# Altium PCB 1-LightingAndSolenoidValve.PcbDoc (part 1 of 3)
Units mm, origin at the board's own origin, x right, y up, seen from the top; angles counter-clockwise.
Board outline 272 x 85 mm, 2 copper layers (Top Layer, Bottom Layer); 366 components, 221 nets, 1073 pads, 653 vias.
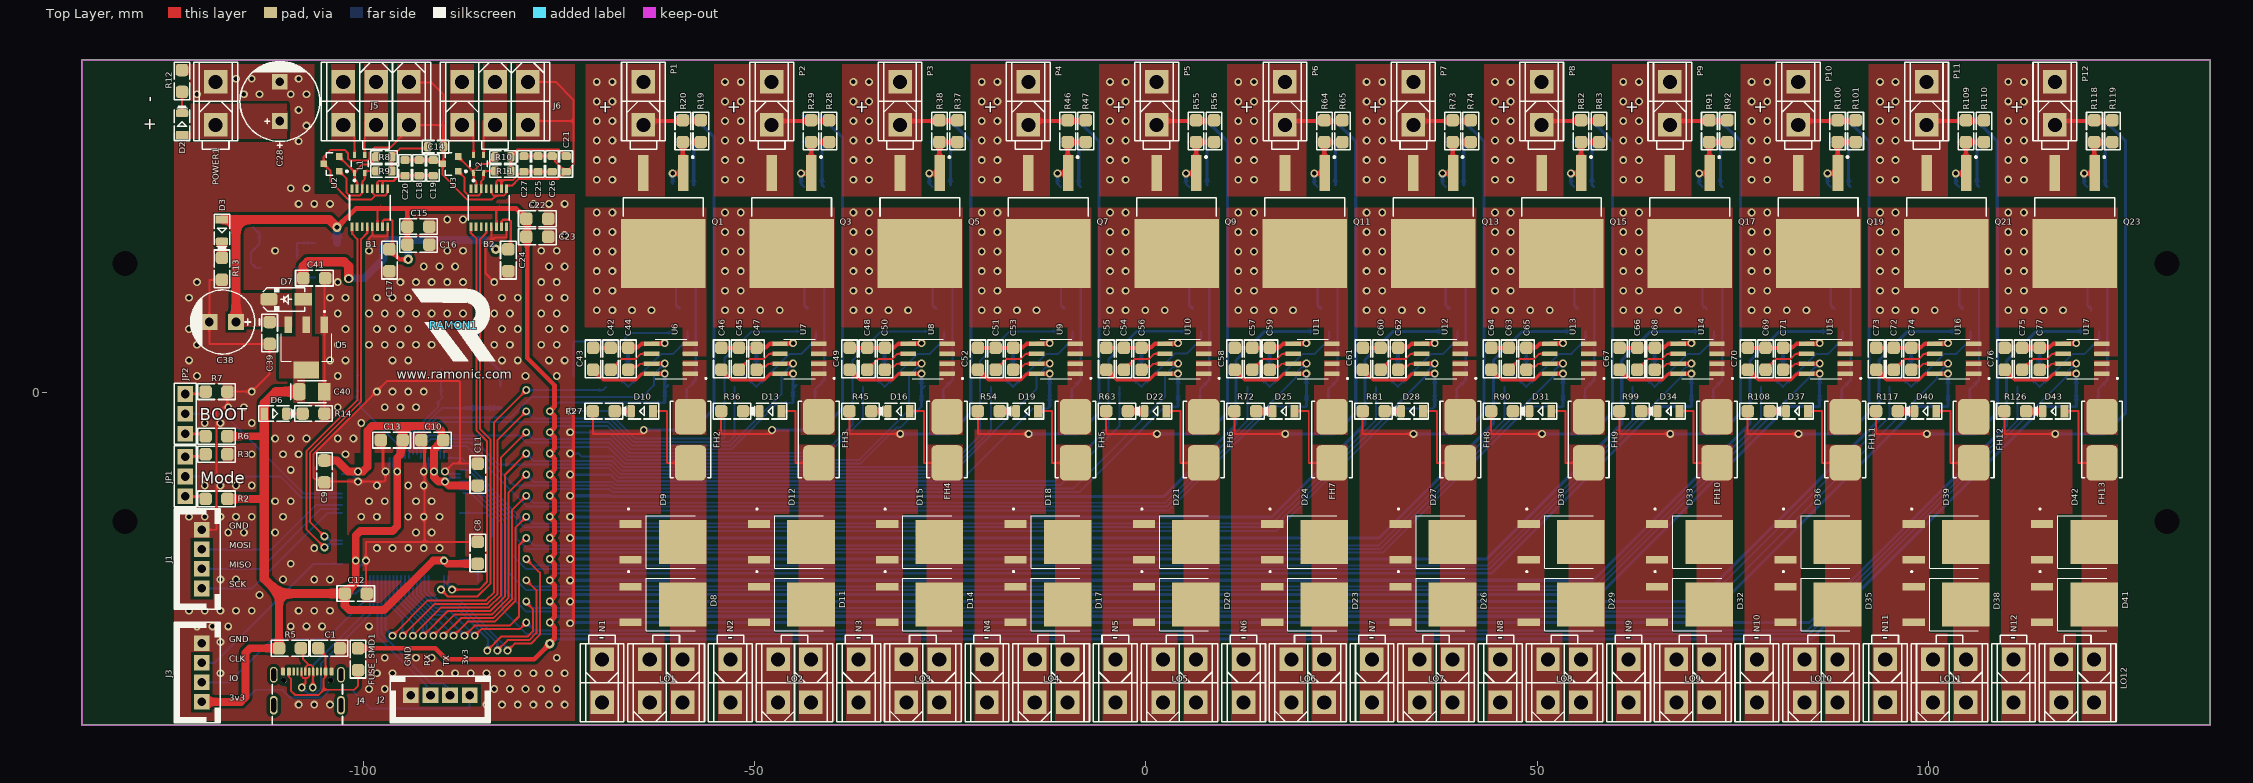
[diagram p0: Top Layer view]
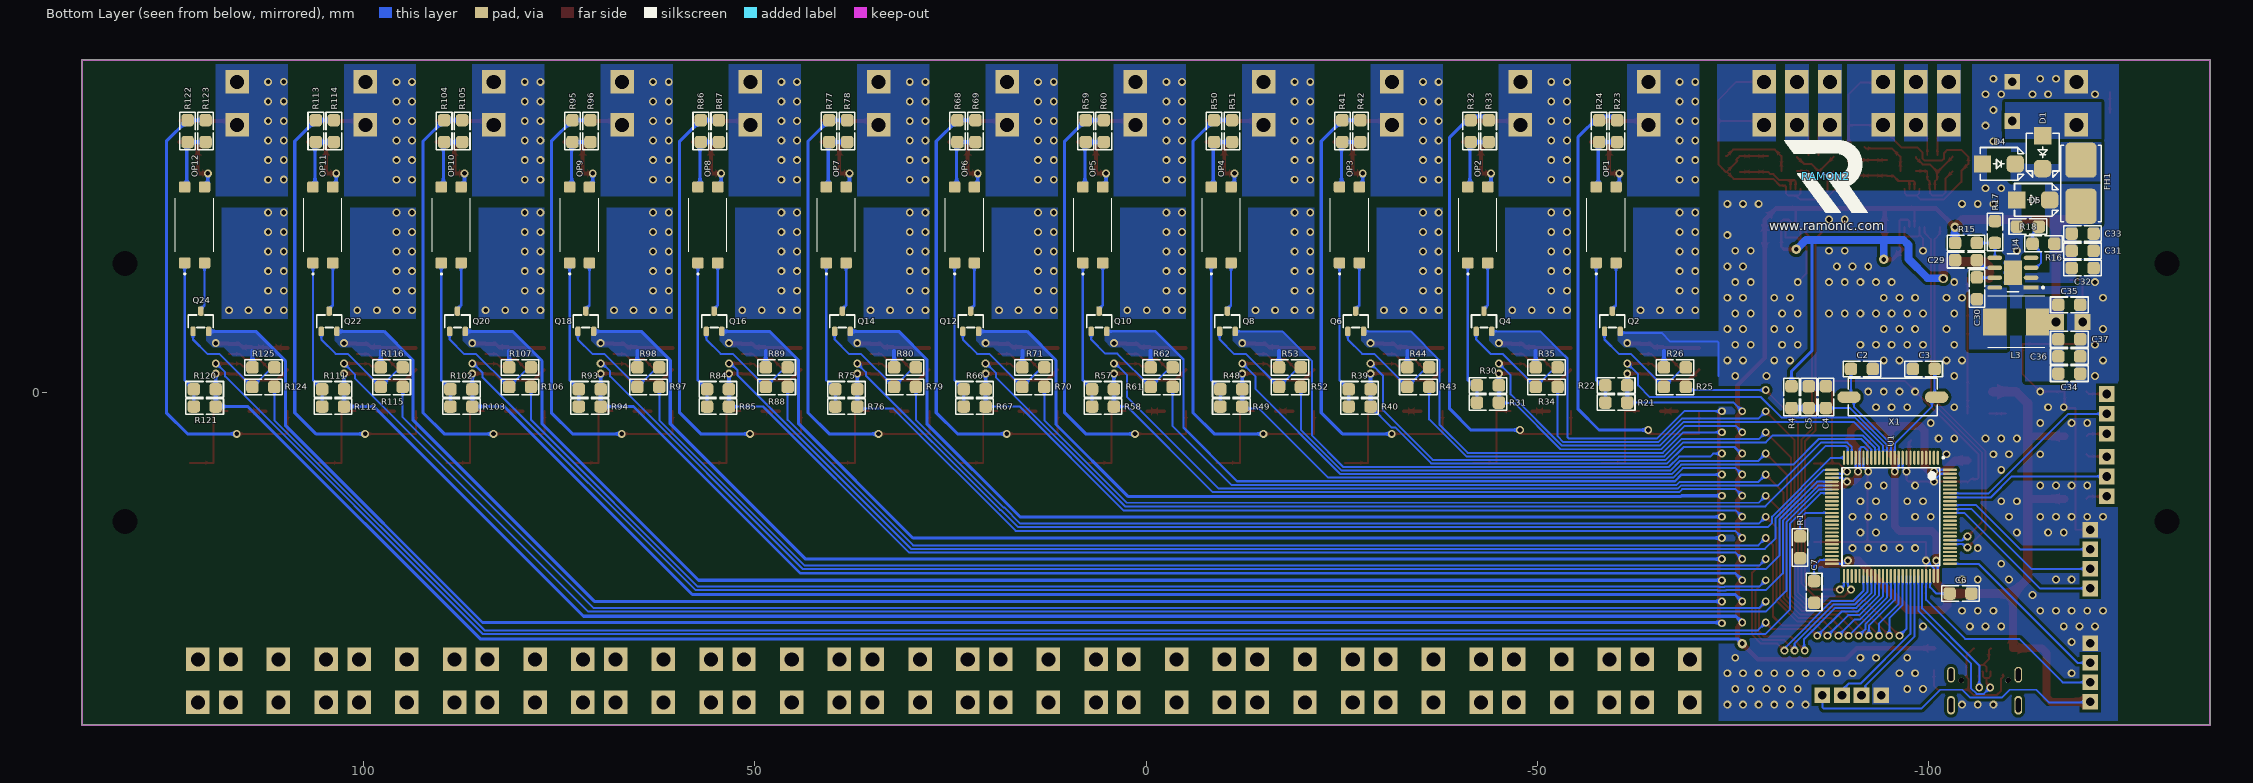
[diagram p1: Bottom Layer view, seen from below]
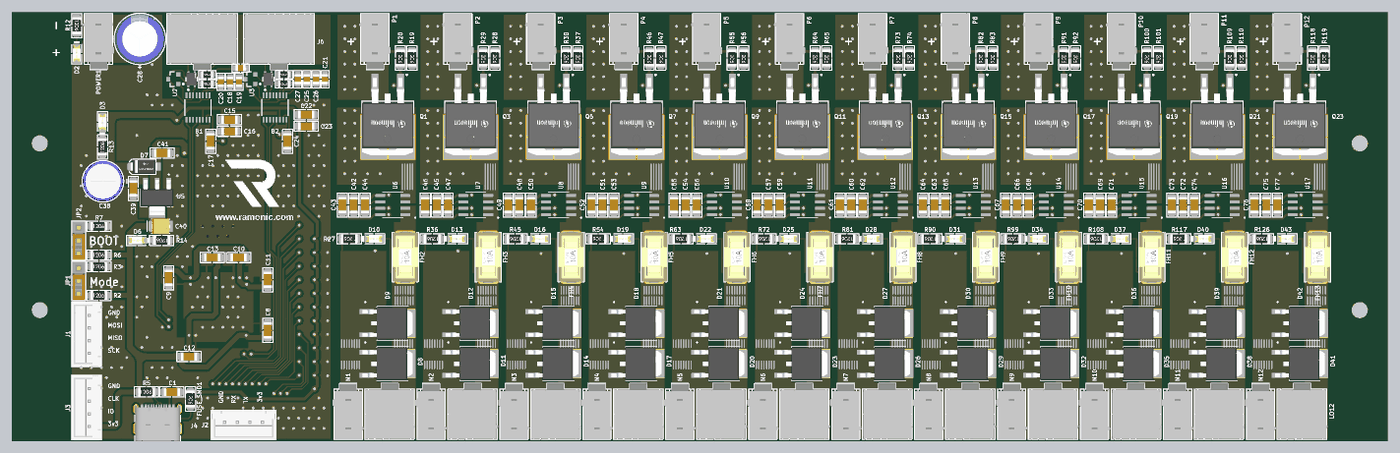
[diagram p4: 3D render of the assembled board from above, using the file's embedded part models]
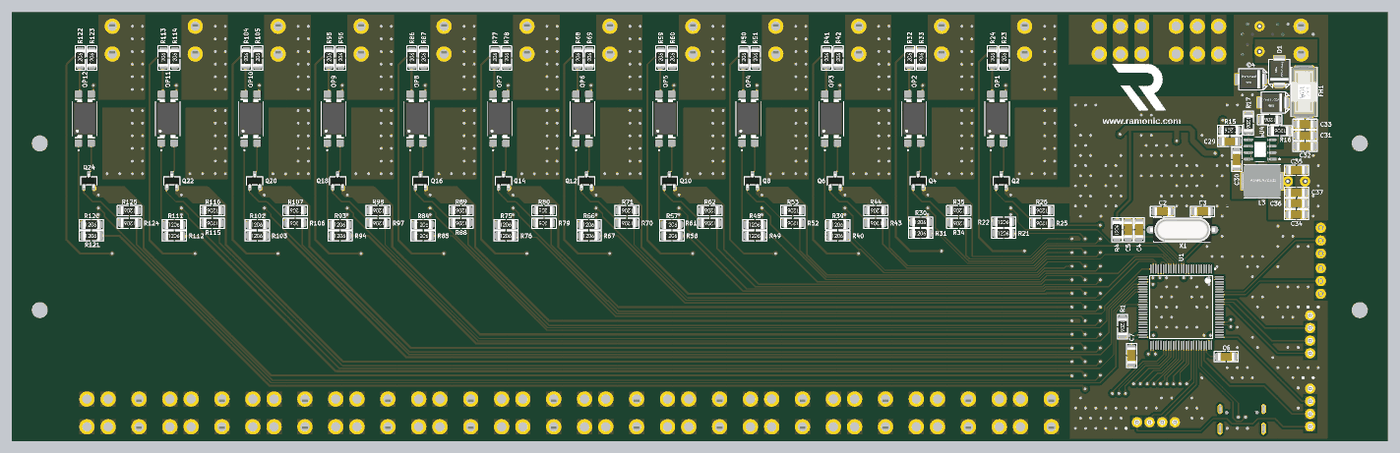
[diagram p5: 3D render of the assembled board from below, using the file's embedded part models]

## Layer stack, top to bottom
Top Solder: solder mask 0.0102, Solder Resist, Dk 3.5
Top Layer: signal copper 0.0356
Dielectric 1: dielectric 0.32, FR-4, Dk 4.8
Bottom Layer: signal copper 0.0356
Bottom Solder: solder mask 0.0102, Solder Resist, Dk 3.5

## Board outline
-136,-42.5 -136,42.5 136,42.5 136,-42.5

## Design rules (kind name [scope] priority, off if disabled: settings)
AcuteAngle [All] p1: minimum=7.50000000000000E+0001 checktracksonly=FALSE
BoardOutlineClearance [All] p1: gap=0.4 ignorepadtopadclearanceinfootprint=FALSE
Clearance "Stitching GND" [IsStitchingVia and InNet('GND') vs (IsVia and (Not IsStitchingVia)) Or IsPad] p1: gap=0.3 ignorepadtopadclearanceinfootprint=FALSE
Clearance [All] p2: gap=0.2 ignorepadtopadclearanceinfootprint=FALSE except(0.3: Arc-THPad Arc-Hole Track-THPad Track-Hole SMDPad-THPad SMDPad-Hole THPad-THPad THPad-Via THPad-Fill THPad-Region THPad-Hole Via-Via Via-Fill Via-Region Via-Hole Fill-Hole Region-Hole; 0.4: Arc-Poly Track-Poly SMDPad-Poly THPad-Poly Via-Poly Fill-Poly Poly-Poly Poly-Region Poly-Text Poly-Hole)
FanoutControl Fanout_Default [All] p1: bgadir=Out bgaviamode=Centered fanoutstyle=Auto fanoutdirection=Alternating viagrid=0.025 // Fanout_Default (Default Rule)
FanoutControl Fanout_Small [(CompPinCount < 5)] p2: bgadir=Out bgaviamode=Centered fanoutstyle=Auto fanoutdirection=OutThenIn viagrid=0.025 // Fanout_Small (Default Rule)
FanoutControl Fanout_LCC [IsLCC] p4: bgadir=Out bgaviamode=Centered fanoutstyle=Auto fanoutdirection=Alternating viagrid=0.025 // Fanout_LCC (Default Rule)
FanoutControl Fanout_BGA [IsBGA] p5: bgadir=Out bgaviamode=Centered fanoutstyle=Auto fanoutdirection=Alternating viagrid=0.025 // Fanout_BGA (Default Rule)
HoleSize [All] p1: absolutevalues=TRUE maxlimit=50 minlimit=0.4 maxpercent=80.000 minpercent=20.000
HoleToHoleClearance [All] p1: gap=0.3 allowstackedmicrovias=TRUE
MinimumAnnularRing [All] p1: minimumring=0.2
MinimumSolderMaskSliver [All] p1: minsoldermaskwidth=0.2
PlaneConnect [All] p1: planeconnectstyle=Direct reliefexpansion=0.508 reliefentries=4 reliefconductorwidth=0.254 reliefairgap=0.254
PolygonConnect [All] p1: connectstyle=Direct reliefconductorwidth=0.254 reliefentries=4 polygonreliefangle="90 Angle" airgapwidth=0.254
RoutingVias [All] p1: holewidth=0.5 width=0.9 viastyle="Through Hole" minholewidth=0.4 minwidth=0.8 maxholewidth=2 maxwidth=3
SilkToSolderMaskClearance [IsPad] p1: minsilkscreentomaskgap=0.2 clearancetoexposedcopper=TRUE
SolderMaskExpansion [All] p1: expansion=0.102 istentingtop=FALSE
SupplyNets "Schematic Supply Nets_13" [InNet('1GND')] p1: voltage=0.000
SupplyNets "Schematic Supply Nets_12" [InNet('6GND')] p2: voltage=0.000
SupplyNets "Schematic Supply Nets_11" [InNet('5GND')] p3: voltage=0.000
SupplyNets "Schematic Supply Nets_10" [InNet('MCUGND')] p4: voltage=0.000
SupplyNets "Schematic Supply Nets_9" [InNet('MGND')] p5: voltage=0.000
SupplyNets "Schematic Supply Nets_8" [InNet('4GND')] p6: voltage=0.000
SupplyNets "Schematic Supply Nets_7" [InNet('2GND')] p7: voltage=0.000
SupplyNets "Schematic Supply Nets_6" [InNet('12GND')] p8: voltage=0.000
SupplyNets "Schematic Supply Nets_5" [InNet('7GND')] p9: voltage=0.000
SupplyNets "Schematic Supply Nets_4" [InNet('8GND')] p10: voltage=0.000
SupplyNets "Schematic Supply Nets_3" [InNet('9GND')] p11: voltage=0.000
SupplyNets "Schematic Supply Nets_2" [InNet('3GND')] p12: voltage=0.000
SupplyNets "Schematic Supply Nets_1" [InNet('11GND')] p13: voltage=0.000
SupplyNets "Schematic Supply Nets" [InNet('10GND')] p14: voltage=0.000
Width [All] p1: maxlimit=10 minlimit=0.2 preferedwidth=0.254
21 further rules are at their usual default settings.

## Classes and differential pairs
component class power: C28 C29 C30 C31 C32 C33 C34 C35 C36 C37 C38 C39 C40 C41 D1 D2 D3 D4 D5 D6 D7 FH1 L3 MainInputVoltage1 POWER1 R12 R13 R14 R15 R16 R17 R18 U4 U5
component class Load12: C75 C76 C77 D41 D42 D43 FH13 LO12 N12 OP12 P12 Q23 Q24 R118 R119 R120 R121 R122 R123 R124 R125 R126 U17
component class Load11: C72 C73 C74 D38 D39 D40 FH12 LO11 N11 OP11 P11 Q21 Q22 R109 R110 R111 R112 R113 R114 R115 R116 R117 U16
component class Load10: C69 C70 C71 D35 D36 D37 FH11 LO10 N10 OP10 P10 Q19 Q20 R100 R101 R102 R103 R104 R105 R106 R107 R108 U15
component class Load9: C66 C67 C68 D32 D33 D34 FH10 LO9 N9 OP9 P9 Q17 Q18 R91 R92 R93 R94 R95 R96 R97 R98 R99 U14
component class Load8: C63 C64 C65 D29 D30 D31 FH9 LO8 N8 OP8 P8 Q15 Q16 R82 R83 R84 R85 R86 R87 R88 R89 R90 U13
component class Load7: C60 C61 C62 D26 D27 D28 FH8 LO7 N7 OP7 P7 Q13 Q14 R73 R74 R75 R76 R77 R78 R79 R80 R81 U12
component class Load6: C57 C58 C59 D23 D24 D25 FH7 LO6 N6 OP6 P6 Q11 Q12 R64 R65 R66 R67 R68 R69 R70 R71 R72 U11
component class Load5: C54 C55 C56 D20 D21 D22 FH6 LO5 N5 OP5 P5 Q9 Q10 R55 R56 R57 R58 R59 R60 R61 R62 R63 U10
component class Load4: C51 C52 C53 D17 D18 D19 FH5 LO4 N4 OP4 P4 Q7 Q8 R46 R47 R48 R49 R50 R51 R52 R53 R54 U9
component class Load3: C48 C49 C50 D14 D15 D16 FH4 LO3 N3 OP3 P3 Q5 Q6 R37 R38 R39 R40 R41 R42 R43 R44 R45 U8
component class Load2: C45 C46 C47 D11 D12 D13 FH3 LO2 N2 OP2 P2 Q3 Q4 R28 R29 R30 R31 R32 R33 R34 R35 R36 U7
component class MCU: C1 C2 C3 C4 C5 C6 C7 C8 C9 C10 C11 C12 C13 FUSE_SMD1 J1 J2 J3 J4 JP1 JP2 R1 R2 R3 R4 R5 R6 R7 RAMON1 RAMON2 U1 X1
component class CAN: B1 B2 C14 C15 C16 C17 C18 C19 C20 C21 C22 C23 C24 C25 C26 C27 J5 J6 L1 L2 R8 R9 R10 R11 U2 U3
component class Load1: C42 C43 C44 D8 D9 D10 FH2 LO1 N1 OP1 P1 Q1 Q2 R19 R20 R21 R22 R23 R24 R25 R26 R27 U6

## Components (designator, comment, footprint, x,y, rotation, side; value= is the part's Value field where it differs from the comment)
B1 "CA-IS2062A" CAIS2062A -99.2,23.6 r90 top locked
B2 "CA-IS2062A" CAIS2062A -84,23.6 r90 top locked
C1 "CAP1206 100nf 50V" C1206#1 -104.4,-32.7 r180 top
C2 "CAP1206 22pf 50V" C1206#2 -91.5,3 r0 bottom locked
C3 "CAP1206 22pf 50V" C1206#2 -99.4,3 r180 bottom locked
C4 "CAP1206 1uf 50V" C1206#2 -86.9,-0.6 r270 bottom locked
C5 "CAP1206 100nf 50V" C1206#2 -84.7,-0.6 r270 bottom locked
C6 "CAP1206 2.2uf 50V" C1206#2 -104.1,-25.7 r0 bottom
C7 "CAP1206 2.2uf 50V" C1206#2 -85.4,-25.5 r90 bottom
C8 "CAP1206 100nf 50V" C1206#1 -85.4,-20.5 r270 top locked
C9 "CAP1206 100nf 50V" C1206#1 -105,-10.1 r90 top locked
C10 "CAP1206 100nf 50V" C1206#1 -91.2,-6.1 r0 top locked
C11 "CAP1206 100nf 50V" C1206#1 -85.4,-10.5 r270 top locked
C12 "CAP1206 100nf 50V" C1206#1 -101,-25.7 r180 top locked
C13 "CAP1206 100nf 50V" C1206#1 -96.4,-6.1 r0 top locked
C14 "CAP0805 4.7nf 50V" C0805 -90.8,31.4 r0 top
C15 "CAP1206 10uf 50V" C1206#1 -93,21.2 r180 top
C16 "CAP1206 100nf 50V" C1206#1 -93,18.9 r180 top
C17 "CAP1206 100nf 50V" C1206#1 -96.7,16.9 r270 top
C18 "CAP0805 100nf 50V" C0805 -92.9,28.7 r270 top
C19 "CAP0805 100nf 50V" C0805 -91.1,28.7 r270 top
C20 "CAP0805 100nf 50V" C0805 -94.7,28.7 r270 top
C21 "CAP0805 4.7nf 50V" C0805 -74.1,29.2 r270 top
C22 "CAP1206 10uf 50V" C1206#1 -77.8,22.2 r180 top
C23 "CAP1206 100nf 50V" C1206#1 -77.8,19.9 r180 top
C24 "CAP1206 100nf 50V" C1206#1 -81.5,16.9 r270 top
C25 "CAP0805 100nf 50V" C0805 -77.7,29.2 r270 top
C26 "CAP0805 100nf 50V" C0805 -75.9,29.2 r270 top
C27 "CAP0805 100nf 50V" C0805 -79.5,29.2 r270 top
C28 "HT1V477M1012PC" C_EL_10X16 -110.7,37.191 r90 top locked value=470uF
C29 "CAP1206 1uf 50V" C1206#2 -104.8,16.9 r0 bottom
C30 "CAP1206 100nf 50V" C1206#2 -106.2,13.3 r270 bottom
C31 "CAP1206 10uf 50V" C1206#2 -119.7,18.1 r180 bottom
C32 "CAP1206 10uf 50V" C1206#2 -119.7,15.9 r180 bottom
C33 "CAP1206 220nf 50V" C1206#2 -119.7,20.3 r180 bottom
C34 "CAP1206 10uf 50V" C1206#2 -118,2.4 r180 bottom
C35 "CAP1206 10uf 50V" C1206#2 -118,11.2 r180 bottom
C36 "CAP1206 10uf 50V" C1206#2 -118,4.6 r180 bottom
C37 "CAP1206 10uf 50V" C1206#2 -118,6.8 r180 bottom
C38 "100uF" C_EL_8X12 -118,9 r180 top
C39 "CAP1206 1uf 50V" C1206#1 -112,7.6 r270 top
C40 "47uF" C_TN_3528 -106.6,0.1 r0 top
C41 "CAP1206 2.2uf 50V" C1206#1 -106.3,14.6 r0 top
C42 "CAP1206 1nf 50V" C1206#1 -68.423,4.3 r90 top
C43 "CAP1206 100nf 50V" C1206#1 -70.673,4.3 r90 top
C44 "CAP1206 1nf 50V" C1206#1 -66.173,4.3 r90 top
C45 "CAP1206 1nf 50V" C1206#1 -52.023,4.3 r90 top
C46 "CAP1206 100nf 50V" C1206#1 -54.273,4.3 r90 top
C47 "CAP1206 1nf 50V" C1206#1 -49.773,4.3 r90 top
C48 "CAP1206 1nf 50V" C1206#1 -35.623,4.3 r90 top
C49 "CAP1206 100nf 50V" C1206#1 -37.873,4.3 r90 top
C50 "CAP1206 1nf 50V" C1206#1 -33.373,4.3 r90 top
C51 "CAP1206 1nf 50V" C1206#1 -19.223,4.3 r90 top
C52 "CAP1206 100nf 50V" C1206#1 -21.473,4.3 r90 top
C53 "CAP1206 1nf 50V" C1206#1 -16.973,4.3 r90 top
C54 "CAP1206 1nf 50V" C1206#1 -2.823,4.3 r90 top
C55 "CAP1206 100nf 50V" C1206#1 -5.073,4.3 r90 top
C56 "CAP1206 1nf 50V" C1206#1 -0.573,4.3 r90 top
C57 "CAP1206 1nf 50V" C1206#1 13.577,4.3 r90 top
C58 "CAP1206 100nf 50V" C1206#1 11.327,4.3 r90 top
C59 "CAP1206 1nf 50V" C1206#1 15.827,4.3 r90 top
C60 "CAP1206 1nf 50V" C1206#1 29.977,4.3 r90 top
C61 "CAP1206 100nf 50V" C1206#1 27.727,4.3 r90 top
C62 "CAP1206 1nf 50V" C1206#1 32.227,4.3 r90 top
C63 "CAP1206 1nf 50V" C1206#1 46.377,4.3 r90 top
C64 "CAP1206 100nf 50V" C1206#1 44.127,4.3 r90 top
C65 "CAP1206 1nf 50V" C1206#1 48.627,4.3 r90 top
C66 "CAP1206 1nf 50V" C1206#1 62.777,4.3 r90 top
C67 "CAP1206 100nf 50V" C1206#1 60.527,4.3 r90 top
C68 "CAP1206 1nf 50V" C1206#1 65.027,4.3 r90 top
C69 "CAP1206 1nf 50V" C1206#1 79.177,4.3 r90 top
C70 "CAP1206 100nf 50V" C1206#1 76.927,4.3 r90 top
C71 "CAP1206 1nf 50V" C1206#1 81.427,4.3 r90 top
C72 "CAP1206 1nf 50V" C1206#1 95.577,4.3 r90 top
C73 "CAP1206 100nf 50V" C1206#1 93.327,4.3 r90 top
C74 "CAP1206 1nf 50V" C1206#1 97.827,4.3 r90 top
C75 "CAP1206 1nf 50V" C1206#1 111.977,4.3 r90 top
C76 "CAP1206 100nf 50V" C1206#1 109.727,4.3 r90 top
C77 "CAP1206 1nf 50V" C1206#1 114.227,4.3 r90 top
D1 "SS34" D_SMB -114.6,30.7 r270 bottom locked
D2 "LED1206GRN" LED1206GRN -123.2,34.3 r90 top locked
D3 "LED1206GRN" LED1206GRN -118.1,20.7 r270 top
D4 "SS34" D_SMB -109,29.2 r180 bottom
D5 "SMBJ24CA" D_SMB -113.4,24.6 r180 bottom
D6 "LED1206GRN" LED1206GRN -111.3,-2.7 r0 top
D7 "ss14" D_SMA -109.9,11.9 r180 top
D8 "SDT20B100D1" DPAK229P990X238-3N -61.733,-27.109 r270 top locked
D9 "SDT20B100D1" DPAK229P990X238-3N -61.733,-19.109 r270 top locked
D10 "LED1206GRN" LED1206GRN -64.4,-2.4 r180 top locked
D11 "SDT20B100D1" DPAK229P990X238-3N -45.333,-27.109 r270 top locked
D12 "SDT20B100D1" DPAK229P990X238-3N -45.333,-19.109 r270 top locked
D13 "LED1206GRN" LED1206GRN -48,-2.4 r180 top locked
D14 "SDT20B100D1" DPAK229P990X238-3N -28.933,-27.109 r270 top locked
D15 "SDT20B100D1" DPAK229P990X238-3N -28.933,-19.109 r270 top locked
D16 "LED1206GRN" LED1206GRN -31.6,-2.4 r180 top locked
D17 "SDT20B100D1" DPAK229P990X238-3N -12.533,-27.109 r270 top locked
D18 "SDT20B100D1" DPAK229P990X238-3N -12.533,-19.109 r270 top locked
D19 "LED1206GRN" LED1206GRN -15.2,-2.4 r180 top locked
D20 "SDT20B100D1" DPAK229P990X238-3N 3.867,-27.109 r270 top locked
D21 "SDT20B100D1" DPAK229P990X238-3N 3.867,-19.109 r270 top locked
D22 "LED1206GRN" LED1206GRN 1.2,-2.4 r180 top locked
D23 "SDT20B100D1" DPAK229P990X238-3N 20.267,-27.109 r270 top locked
D24 "SDT20B100D1" DPAK229P990X238-3N 20.267,-19.109 r270 top locked
D25 "LED1206GRN" LED1206GRN 17.6,-2.4 r180 top locked
D26 "SDT20B100D1" DPAK229P990X238-3N 36.667,-27.109 r270 top locked
D27 "SDT20B100D1" DPAK229P990X238-3N 36.667,-19.109 r270 top locked
D28 "LED1206GRN" LED1206GRN 34,-2.4 r180 top locked
D29 "SDT20B100D1" DPAK229P990X238-3N 53.067,-27.109 r270 top locked
D30 "SDT20B100D1" DPAK229P990X238-3N 53.067,-19.109 r270 top locked
D31 "LED1206GRN" LED1206GRN 50.4,-2.4 r180 top locked
D32 "SDT20B100D1" DPAK229P990X238-3N 69.467,-27.109 r270 top locked
D33 "SDT20B100D1" DPAK229P990X238-3N 69.467,-19.109 r270 top locked
D34 "LED1206GRN" LED1206GRN 66.8,-2.4 r180 top locked
D35 "SDT20B100D1" DPAK229P990X238-3N 85.867,-27.109 r270 top locked
D36 "SDT20B100D1" DPAK229P990X238-3N 85.867,-19.109 r270 top locked
D37 "LED1206GRN" LED1206GRN 83.2,-2.4 r180 top locked
D38 "SDT20B100D1" DPAK229P990X238-3N 102.267,-27.109 r270 top locked
D39 "SDT20B100D1" DPAK229P990X238-3N 102.267,-19.109 r270 top locked
D40 "LED1206GRN" LED1206GRN 99.6,-2.4 r180 top locked
D41 "SDT20B100D1" DPAK229P990X238-3N 118.667,-27.109 r270 top locked
D42 "SDT20B100D1" DPAK229P990X238-3N 118.667,-19.109 r270 top locked
D43 "LED1206GRN" LED1206GRN 116,-2.4 r180 top locked
FH1 "xf-155" FH_24101812#1 -119.5,26.7 r270 bottom value="Fuse Holder"
FH2 "FUSE HOLDER" FH_24101812#2 -58.223,-6 r90 top locked value="Fuse Holder"
FH3 "Fuse Holder" FH_24101812#2 -41.823,-6 r90 top locked
FH4 "Fuse Holder" FH_24101812#2 -25.423,-6 r90 top locked
FH5 "Fuse Holder" FH_24101812#2 -9.023,-6 r90 top locked
FH6 "Fuse Holder" FH_24101812#2 7.377,-6 r90 top locked
FH7 "Fuse Holder" FH_24101812#2 23.777,-6 r90 top locked
FH8 "Fuse Holder" FH_24101812#2 40.177,-6 r90 top locked
FH9 "Fuse Holder" FH_24101812#2 56.577,-6 r90 top locked
FH10 "Fuse Holder" FH_24101812#2 72.977,-6 r90 top locked
FH11 "Fuse Holder" FH_24101812#2 89.377,-6 r90 top locked
FH12 "Fuse Holder" FH_24101812#2 105.777,-6 r90 top locked
FH13 "Fuse Holder" FH_24101812#2 122.177,-6 r90 top locked
FUSE_SMD1 "FUSE1206" R1206#1 -100.7,-34.1 r270 top
J1 "XH_4" XH_4 -120.7,-21.3 r90 top locked
J2 "XH_4" XH_4 -90.2,-38.7 r180 top
J3 "XH_4" XH_4 -120.7,-35.8 r90 top locked
J4 "DX07S016JA1" USBC_SMD_16_DX07S016JA1 -107.19,-35.68 r180 top
J5 "CONN_ATXPWR_6" ATXPWR_6 -98.4,37.191 r0 top
J6 "CONN_ATXPWR_6" ATXPWR_6 -83.2,37.191 r0 top locked
JP1 "JMPHDR3PIN" JPH_3 -122.8,-10.74 r90 top locked
JP2 "JMPHDR3PIN" JPH_3 -122.8,-2.74 r90 top locked
L1 "ACM2520-102-2P-T002" FP-ACM2520-2P-MFG -100.5,29.2 r90 top
L2 "ACM2520-102-2P-T002" FP-ACM2520-2P-MFG -85.3,29.2 r90 top
L3 "8uH-7.3mmx6.6mm" IND_AMPLA7050S-100MT -111.2,9 r180 bottom
LO1 "CONN_ATXPWR_4" ATXPWR_4 -61.323,-37.109 r180 top
LO2 "CONN_ATXPWR_4" ATXPWR_4 -44.923,-37.109 r180 top
LO3 "CONN_ATXPWR_4" ATXPWR_4 -28.523,-37.109 r180 top
LO4 "CONN_ATXPWR_4" ATXPWR_4 -12.123,-37.109 r180 top
LO5 "CONN_ATXPWR_4" ATXPWR_4 4.277,-37.109 r180 top
LO6 "CONN_ATXPWR_4" ATXPWR_4 20.677,-37.109 r180 top
LO7 "CONN_ATXPWR_4" ATXPWR_4 37.077,-37.109 r180 top
LO8 "CONN_ATXPWR_4" ATXPWR_4 53.477,-37.109 r180 top
LO9 "CONN_ATXPWR_4" ATXPWR_4 69.877,-37.109 r180 top
LO10 "CONN_ATXPWR_4" ATXPWR_4 86.277,-37.109 r180 top
LO11 "CONN_ATXPWR_4" ATXPWR_4 102.677,-37.109 r180 top
LO12 "CONN_ATXPWR_4" ATXPWR_4 119.077,-37.109 r180 top locked
N1 "CONN_ATXPWR_2" ATXPWR_2 -69.523,-37.109 r180 top locked
N2 "CONN_ATXPWR_2" ATXPWR_2 -53.123,-37.109 r180 top locked
N3 "CONN_ATXPWR_2" ATXPWR_2 -36.723,-37.109 r180 top locked
N4 "CONN_ATXPWR_2" ATXPWR_2 -20.323,-37.109 r180 top locked
N5 "CONN_ATXPWR_2" ATXPWR_2 -3.923,-37.109 r180 top locked
N6 "CONN_ATXPWR_2" ATXPWR_2 12.477,-37.109 r180 top locked
N7 "CONN_ATXPWR_2" ATXPWR_2 28.877,-37.109 r180 top locked
N8 "CONN_ATXPWR_2" ATXPWR_2 45.277,-37.109 r180 top locked
N9 "CONN_ATXPWR_2" ATXPWR_2 61.677,-37.109 r180 top locked
N10 "CONN_ATXPWR_2" ATXPWR_2 78.077,-37.109 r180 top locked
N11 "CONN_ATXPWR_2" ATXPWR_2 94.477,-37.109 r180 top locked
N12 "CONN_ATXPWR_2" ATXPWR_2 110.877,-37.109 r180 top locked
OP1 "EL817S" SOIC254P1030X460-4N -58.8,21.4 r90 bottom
OP2 "EL817S" SOIC254P1030X460-4N -42.4,21.4 r90 bottom
OP3 "EL817S" SOIC254P1030X460-4N -26,21.4 r90 bottom
OP4 "EL817S" SOIC254P1030X460-4N -9.6,21.4 r90 bottom
OP5 "EL817S" SOIC254P1030X460-4N 6.8,21.4 r90 bottom
OP6 "EL817S" SOIC254P1030X460-4N 23.2,21.4 r90 bottom
OP7 "EL817S" SOIC254P1030X460-4N 39.6,21.4 r90 bottom
OP8 "EL817S" SOIC254P1030X460-4N 56,21.4 r90 bottom
OP9 "EL817S" SOIC254P1030X460-4N 72.4,21.4 r90 bottom
OP10 "EL817S" SOIC254P1030X460-4N 88.8,21.4 r90 bottom
OP11 "EL817S" SOIC254P1030X460-4N 105.2,21.4 r90 bottom
OP12 "EL817S" SOIC254P1030X460-4N 121.6,21.4 r90 bottom
P1 "CONN_ATXPWR_2" ATXPWR_2 -64.238,37.191 r0 top locked
P2 "CONN_ATXPWR_2" ATXPWR_2 -47.838,37.191 r0 top locked
P3 "CONN_ATXPWR_2" ATXPWR_2 -31.438,37.191 r0 top locked
P4 "CONN_ATXPWR_2" ATXPWR_2 -15.038,37.191 r0 top locked
P5 "CONN_ATXPWR_2" ATXPWR_2 1.362,37.191 r0 top locked
P6 "CONN_ATXPWR_2" ATXPWR_2 17.762,37.191 r0 top locked
P7 "CONN_ATXPWR_2" ATXPWR_2 34.162,37.191 r0 top locked
P8 "CONN_ATXPWR_2" ATXPWR_2 50.562,37.191 r0 top locked
P9 "CONN_ATXPWR_2" ATXPWR_2 66.962,37.191 r0 top locked
P10 "CONN_ATXPWR_2" ATXPWR_2 83.362,37.191 r0 top locked
P11 "CONN_ATXPWR_2" ATXPWR_2 99.762,37.191 r0 top locked
P12 "CONN_ATXPWR_2" ATXPWR_2 116.162,37.191 r0 top locked
POWER1 "CONN_ATXPWR_2" ATXPWR_2 -118.9,37.191 r0 top locked
Q1 "IRF9530NS" TO254P1528X508-4_3N-V1 -61.698,22.891 r270 top locked
Q2 "2N7002" SOT23_3 -59.6,9.1 r90 bottom locked
Q3 "IRF9530NS" TO254P1528X508-4_3N-V1 -45.298,22.891 r270 top locked
Q4 "2N7002" SOT23_3 -43.2,9.1 r90 bottom locked
Q5 "IRF9530NS" TO254P1528X508-4_3N-V1 -28.898,22.891 r270 top locked
Q6 "2N7002" SOT23_3 -26.8,9.1 r90 bottom locked
Q7 "IRF9530NS" TO254P1528X508-4_3N-V1 -12.498,22.891 r270 top locked
Q8 "2N7002" SOT23_3 -10.4,9.1 r90 bottom locked
Q9 "IRF9530NS" TO254P1528X508-4_3N-V1 3.902,22.891 r270 top locked
Q10 "2N7002" SOT23_3 6,9.1 r90 bottom locked
Q11 "IRF9530NS" TO254P1528X508-4_3N-V1 20.302,22.891 r270 top locked
Q12 "2N7002" SOT23_3 22.4,9.1 r90 bottom locked
Q13 "IRF9530NS" TO254P1528X508-4_3N-V1 36.702,22.891 r270 top locked
Q14 "2N7002" SOT23_3 38.8,9.1 r90 bottom locked
Q15 "IRF9530NS" TO254P1528X508-4_3N-V1 53.102,22.891 r270 top locked
Q16 "2N7002" SOT23_3 55.2,9.1 r90 bottom locked
Q17 "IRF9530NS" TO254P1528X508-4_3N-V1 69.502,22.891 r270 top locked
Q18 "2N7002" SOT23_3 71.6,9.1 r90 bottom locked
Q19 "IRF9530NS" TO254P1528X508-4_3N-V1 85.902,22.891 r270 top locked
Q20 "2N7002" SOT23_3 88,9.1 r90 bottom locked
Q21 "IRF9530NS" TO254P1528X508-4_3N-V1 102.302,22.891 r270 top locked
Q22 "2N7002" SOT23_3 104.4,9.1 r90 bottom locked
Q23 "IRF9530NS" TO254P1528X508-4_3N-V1 118.702,22.891 r270 top locked
Q24 "2N7002" SOT23_3 120.8,9.1 r90 bottom locked
R1 "RES1206 4.7K 1%" R1206#2 -83.6,-19.8 r270 bottom
R2 "RES1206 4.7K 1%" R1206#1 -118.8,-13.6 r0 top locked
R3 "RES1206 4.7K 1%" R1206#1 -118.8,-7.9 r0 top locked
R4 "RES1206 4.7K 1%" R1206#2 -82.5,-0.6 r90 bottom locked
R5 "RES1206 4.7K 1%" R1206#1 -109.4,-32.7 r0 top
R6 "RES1206 4.7K 1%" R1206#1 -118.8,-5.6 r0 top locked
R7 "RES1206 4.7K 1%" R1206#1 -118.8,0.1 r0 top locked
R8 "RES1206 60 1%" R0805 -97.4,30.1 r180 top
R9 "RES1206 60 1%" R0805 -97.4,28.3 r0 top
R10 "RES1206 60 1%" R0805 -82.2,30.1 r180 top
R11 "RES1206 60 1%" R0805 -82.2,28.3 r0 top
R12 "RES1206 2.2K 1%" R1206#1 -123.2,39.8 r270 top locked
R13 "RES1206 560R 1%" R1206#1 -118.1,15.8 r90 top
R14 "RES1206 180R 1%" R1206#1 -106.4,-2.7 r180 top
R15 "RES1206 100k 1%" R1206#2 -104.8,19.1 r0 bottom
R16 "RES1206 100K 1%" R1206#2 -114.7,19 r0 bottom
R17 "RES1206 24.9k 1%" R1206#2 -108.5,20.5 r270 bottom
R18 "RES1206 10K 1%" R1206#2 -112.7,21.2 r0 bottom
R19 "RES1206 12K 1%" R1206#1 -56.9,33.4 r270 top locked
R20 "RES1206 12K 1%" R1206#1 -59.2,33.4 r270 top locked
R21 "RES1206 470 1%" R1206#2 -60.1,-1.3 r180 bottom
R22 "RES1206 470 1%" R1206#2 -60.1,0.9 r180 bottom
R23 "RES1206 12K 1%" R1206#2 -60.2,33.4 r90 bottom locked
R24 "RES1206 12K 1%" R1206#2 -57.9,33.4 r90 bottom locked
R25 "RES1206 100R 1%" R1206#2 -67.6,0.7 r0 bottom locked
R26 "RES1206 12K 1%" R1206#2 -67.6,3.2 r0 bottom locked
R27 "RES1206 12K 1%" R1206#1 -69.3,-2.4 r180 top locked
R28 "RES1206 12K 1%" R1206#1 -40.5,33.4 r270 top locked
R29 "RES1206 12K 1%" R1206#1 -42.8,33.4 r270 top locked
R30 "RES1206 470 1%" R1206#2 -43.7,0.9 r180 bottom
R31 "RES1206 470 1%" R1206#2 -43.7,-1.3 r180 bottom
R32 "RES1206 12K 1%" R1206#2 -41.5,33.4 r90 bottom locked
R33 "RES1206 12K 1%" R1206#2 -43.8,33.4 r90 bottom locked
R34 "RES1206 100R 1%" R1206#2 -51.2,0.7 r0 bottom locked
R35 "RES1206 12K 1%" R1206#2 -51.2,3.2 r0 bottom locked
R36 "RES1206 12K 1%" R1206#1 -52.9,-2.4 r180 top locked
R37 "RES1206 12K 1%" R1206#1 -24.1,33.4 r270 top locked
R38 "RES1206 12K 1%" R1206#1 -26.4,33.4 r270 top locked
R39 "RES1206 470 1%" R1206#2 -27.3,0.4 r180 bottom
R40 "RES1206 470 1%" R1206#2 -27.3,-1.8 r180 bottom
R41 "RES1206 12K 1%" R1206#2 -25.1,33.4 r90 bottom locked
R42 "RES1206 12K 1%" R1206#2 -27.4,33.4 r90 bottom locked
R43 "RES1206 100R 1%" R1206#2 -34.8,0.7 r0 bottom locked
R44 "RES1206 12K 1%" R1206#2 -34.8,3.2 r0 bottom locked
R45 "RES1206 12K 1%" R1206#1 -36.5,-2.4 r180 top locked
R46 "RES1206 12K 1%" R1206#1 -10,33.4 r270 top locked
R47 "RES1206 12K 1%" R1206#1 -7.7,33.4 r270 top locked
R48 "RES1206 470 1%" R1206#2 -10.9,0.4 r180 bottom
R49 "RES1206 470 1%" R1206#2 -10.9,-1.8 r180 bottom
R50 "RES1206 12K 1%" R1206#2 -8.7,33.4 r90 bottom locked
R51 "RES1206 12K 1%" R1206#2 -11,33.4 r90 bottom locked
R52 "RES1206 100R 1%" R1206#2 -18.4,0.7 r0 bottom locked
R53 "RES1206 12K 1%" R1206#2 -18.4,3.2 r0 bottom locked
R54 "RES1206 12K 1%" R1206#1 -20.1,-2.4 r180 top locked
R55 "RES1206 12K 1%" R1206#1 6.4,33.4 r270 top locked
R56 "RES1206 12K 1%" R1206#1 8.7,33.4 r270 top locked
R57 "RES1206 470 1%" R1206#2 5.5,0.4 r180 bottom
R58 "RES1206 470 1%" R1206#2 5.5,-1.8 r180 bottom
R59 "RES1206 12K 1%" R1206#2 7.7,33.4 r90 bottom locked
R60 "RES1206 12K 1%" R1206#2 5.4,33.4 r90 bottom locked
R61 "RES1206 100R 1%" R1206#2 -2,0.7 r0 bottom locked
R62 "RES1206 12K 1%" R1206#2 -2,3.2 r0 bottom locked
R63 "RES1206 12K 1%" R1206#1 -3.7,-2.4 r180 top locked
R64 "RES1206 12K 1%" R1206#1 22.8,33.4 r270 top locked
R65 "RES1206 12K 1%" R1206#1 25.1,33.4 r270 top locked
R66 "RES1206 470 1%" R1206#2 21.9,0.4 r180 bottom
R67 "RES1206 470 1%" R1206#2 21.9,-1.8 r180 bottom
R68 "RES1206 12K 1%" R1206#2 24.1,33.4 r90 bottom locked
R69 "RES1206 12K 1%" R1206#2 21.8,33.4 r90 bottom locked
R70 "RES1206 100R 1%" R1206#2 14.4,0.7 r0 bottom locked
R71 "RES1206 12K 1%" R1206#2 14.4,3.2 r0 bottom locked
R72 "RES1206 12K 1%" R1206#1 12.7,-2.4 r180 top locked
R73 "RES1206 12K 1%" R1206#1 39.2,33.4 r270 top locked
R74 "RES1206 12K 1%" R1206#1 41.5,33.4 r270 top locked
R75 "RES1206 470 1%" R1206#2 38.3,0.4 r180 bottom
R76 "RES1206 470 1%" R1206#2 38.3,-1.8 r180 bottom
R77 "RES1206 12K 1%" R1206#2 40.5,33.4 r90 bottom locked
R78 "RES1206 12K 1%" R1206#2 38.2,33.4 r90 bottom locked
R79 "RES1206 100R 1%" R1206#2 30.8,0.7 r0 bottom locked
R80 "RES1206 12K 1%" R1206#2 30.8,3.2 r0 bottom locked
R81 "RES1206 12K 1%" R1206#1 29.1,-2.4 r180 top locked
R82 "RES1206 12K 1%" R1206#1 55.6,33.4 r270 top locked
R83 "RES1206 12K 1%" R1206#1 57.9,33.4 r270 top locked
R84 "RES1206 470 1%" R1206#2 54.7,0.4 r180 bottom
R85 "RES1206 470 1%" R1206#2 54.7,-1.8 r180 bottom
R86 "RES1206 12K 1%" R1206#2 56.9,33.4 r90 bottom locked
R87 "RES1206 12K 1%" R1206#2 54.6,33.4 r90 bottom locked
R88 "RES1206 100R 1%" R1206#2 47.2,0.7 r0 bottom locked
R89 "RES1206 12K 1%" R1206#2 47.2,3.2 r0 bottom locked
R90 "RES1206 12K 1%" R1206#1 45.5,-2.4 r180 top locked
R91 "RES1206 12K 1%" R1206#1 72,33.4 r270 top locked
R92 "RES1206 12K 1%" R1206#1 74.3,33.4 r270 top locked
R93 "RES1206 470 1%" R1206#2 71.1,0.4 r180 bottom
R94 "RES1206 470 1%" R1206#2 71.1,-1.8 r180 bottom
R95 "RES1206 12K 1%" R1206#2 73.3,33.4 r90 bottom locked
R96 "RES1206 12K 1%" R1206#2 71,33.4 r90 bottom locked
R97 "RES1206 100R 1%" R1206#2 63.6,0.7 r0 bottom locked
R98 "RES1206 12K 1%" R1206#2 63.6,3.2 r0 bottom locked
R99 "RES1206 12K 1%" R1206#1 61.9,-2.4 r180 top locked
R100 "RES1206 12K 1%" R1206#1 88.4,33.4 r270 top locked
R101 "RES1206 12K 1%" R1206#1 90.7,33.4 r270 top locked
R102 "RES1206 470 1%" R1206#2 87.5,0.4 r180 bottom
R103 "RES1206 470 1%" R1206#2 87.5,-1.8 r180 bottom
R104 "RES1206 12K 1%" R1206#2 89.7,33.4 r90 bottom locked
R105 "RES1206 12K 1%" R1206#2 87.4,33.4 r90 bottom locked
R106 "RES1206 100R 1%" R1206#2 80,0.7 r0 bottom locked
R107 "RES1206 12K 1%" R1206#2 80,3.2 r0 bottom locked
R108 "RES1206 12K 1%" R1206#1 78.3,-2.4 r180 top locked
R109 "RES1206 12K 1%" R1206#1 104.8,33.4 r270 top locked
R110 "RES1206 12K 1%" R1206#1 107.1,33.4 r270 top locked
R111 "RES1206 470 1%" R1206#2 103.9,0.4 r180 bottom
R112 "RES1206 470 1%" R1206#2 103.9,-1.8 r180 bottom
R113 "RES1206 12K 1%" R1206#2 106.1,33.4 r90 bottom locked
R114 "RES1206 12K 1%" R1206#2 103.8,33.4 r90 bottom locked
R115 "RES1206 100R 1%" R1206#2 96.4,0.7 r0 bottom locked
R116 "RES1206 12K 1%" R1206#2 96.4,3.2 r0 bottom locked
R117 "RES1206 12K 1%" R1206#1 94.7,-2.4 r180 top locked
R118 "RES1206 12K 1%" R1206#1 121.2,33.4 r270 top locked
R119 "RES1206 12K 1%" R1206#1 123.5,33.4 r270 top locked
R120 "RES1206 470 1%" R1206#2 120.3,0.4 r180 bottom
R121 "RES1206 470 1%" R1206#2 120.3,-1.8 r180 bottom
R122 "RES1206 12K 1%" R1206#2 122.5,33.4 r90 bottom locked
R123 "RES1206 12K 1%" R1206#2 120.2,33.4 r90 bottom locked
R124 "RES1206 100R 1%" R1206#2 112.8,0.7 r0 bottom locked
R125 "RES1206 12K 1%" R1206#2 112.8,3.2 r0 bottom locked
R126 "RES1206 12K 1%" R1206#1 111.1,-2.4 r180 top locked
RAMON1 "WWW.RAMONIC.COM" PCBComponent_1 -88.5,8.6 r0 top
RAMON2 "WWW.RAMONIC.COM" PCBComponent_1 -86.9,27.6 r180 bottom
U1 "STM32F407VGT6" STM-LQFP100_N -95.2,-15.9 r270 bottom
U2 "NUP2105LT1G" PRKT-SOT23-3_V -104.1,29.2 r180 top locked
U3 "NUP2105LT1G" PRKT-SOT23-3_V -88.9,29.2 r180 top locked
U4 "LMR33630ADDAR" FP-DDA0008J-IPC_C -110.8,15.3 r0 bottom
U5 "TLV76133DCYR" VREG_TLV76133DCYR -107.299,5.749 r270 top
U6 "MT9223-20BR5" SOIC127P600X175-8N -60.698,4.3 r180 top
U7 "MT9223-20BR5" SOIC127P600X175-8N -44.298,4.3 r180 top
U8 "MT9223-20BR5" SOIC127P600X175-8N -27.898,4.3 r180 top
U9 "MT9223-20BR5" SOIC127P600X175-8N -11.498,4.3 r180 top
U10 "MT9223-20BR5" SOIC127P600X175-8N 4.902,4.3 r180 top
U11 "MT9223-20BR5" SOIC127P600X175-8N 21.302,4.3 r180 top
U12 "MT9223-20BR5" SOIC127P600X175-8N 37.702,4.3 r180 top
U13 "MT9223-20BR5" SOIC127P600X175-8N 54.102,4.3 r180 top
U14 "MT9223-20BR5" SOIC127P600X175-8N 70.502,4.3 r180 top
U15 "MT9223-20BR5" SOIC127P600X175-8N 86.902,4.3 r180 top
U16 "MT9223-20BR5" SOIC127P600X175-8N 103.302,4.3 r180 top
U17 "MT9223-20BR5" SOIC127P600X175-8N 119.702,4.3 r180 top locked
X1 "XTL_8MHz" XTL_2_11X5 -95.45,-0.6 r180 bottom locked

## Footprints (in the part's own frame and the unit in brackets; to place one, negate y for a bottom-side part, rotate by r counter-clockwise, add the part's x,y. Pads: shape width x height; smd on the part's side, far side on the other; paste and mask are expansions set on the pad)
ATXPWR_2 [mm] "Connector; ATX Power; 2 Position, Molex 39281023"
  rect 3x3 hole 1.8 mask-2539.97: 1(0,2.5) 2(0,-3)
  silkscreen extent -2.8,-6.1 2.8,5, body extent -3.1,-6 3.1,5, height 12.8
ATXPWR_4 [mm] "Connector; ATX Power; 4 Position, TE 4-1775099-0"
  rect 3x3 hole 1.8 mask-2539.97: 1(-2.1,2.5) 2(2.1,2.5) 3(-2.1,-3) 4(2.1,-3)
  silkscreen extent -4.9,-6.1 4.9,5, body extent -5.1,-6.1 4.75,4.8, height 13
ATXPWR_6 [mm] "Connector; ATX Power; 6 Position, TE 4-1775099-1"
  rect 3x3 hole 1.8 mask-2539.97: 1(-4.2,2.5) 2(0,2.5) 3(4.2,2.5) 4(-4.2,-3) 5(0,-3) 6(4.2,-3)
  silkscreen extent -7,-6.1 7,5, body extent -6.85,-6.1 6.85,4.8, height 13
C0805 [mm] "CHIP Capacitor, 2.0X1.3mm, 0805"
  rrect50% 1x1.2 smd mask-2539.97: 1(-1,0) 2(1,0)
  Top Layer pour cut-out: -0.5,0.8 0.5,0.8 0.5,-0.8 -0.5,-0.8
  silkscreen extent -1.7,-0.8 1.7,0.8, body extent -1,-0.62 1,0.63, height 1
C1206#1 [mm] "CHIP Capacitor, 3.2X1.6mm, 1206"
  rrect50% 1.6x1.6 smd mask-2539.97: 1(-1.4,0) 2(1.4,0)
  Top Layer pour cut-out: -0.8,1 -0.8,-1 0.8,-1 0.8,1
  silkscreen extent -2.4,-1 2.4,1, body extent -1.6,-0.8 1.6,0.8, height 1
C1206#2 [mm] "CHIP Capacitor, 3.2X1.6mm, 1206"
  rrect50% 1.6x1.6 smd mask+0.075: 1(-1.4,0) 2(1.4,0)
  Top Layer pour cut-out: -0.8,1 -0.8,-1 0.8,-1 0.8,1
  silkscreen extent -2.4,-1 2.4,1, body extent -1.6,-0.8 1.6,0.8, height 1
C_EL_8X12 [mm] "Capacitor Electrolythic, D8.0X12.0H pitch: 3.5mm"
  rect 2x2 hole 1.1 mask-2539.97: 1(-1.7,0) 2(1.7,0)
  silkscreen extent -4.7,-4.1 4.1,4.1, body extent -4.03,-4.03 4.03,4.03, height 2.98
C_EL_10X16 [mm] "Capacitor Electrolythic, D10.0X16.0H pitch: 5.0mm"
  rect 2x2 hole 1.1 mask-2539.97: 1(-2.5,0) 2(2.5,0)
  silkscreen extent -5.9,-5.1 5.1,5.1, body extent -5,-5 5,5, height 16
C_TN_3528 [mm] "CAPACITOR, TAN B, TAN H, TAN T, TAN M, 3528P, 1210P, 3.5X2.8mm"
  rrect50% 1.6x2.2 smd mask-2539.97: 1(-1.6,0)
  rect 1.6x2.2 smd mask-2539.97: 2(1.6,0)
  Top Layer pour cut-out: -0.889,1.4 -0.889,-1.4 0.889,-1.4 0.889,1.4
  silkscreen extent -2.7,-1.4 1.8,1.4, body extent -1.85,-1.47 1.85,1.46, height 2.03
CAIS2062A [mm]
  rect 1.1x0.35 smd mask-2539.97: 1(-2.425,2.275) 2(-2.425,1.625) 3(-2.425,0.975) 4(-2.425,0.325) 5(-2.425,-0.325) 6(-2.425,-0.975) 7(-2.425,-1.625) 8(-2.425,-2.275) 9(2.425,-2.275) 10(2.425,-1.625) 11(2.425,-0.975) 12(2.425,-0.325) 13(2.425,0.325) 14(2.425,0.975) 15(2.425,1.625) 16(2.425,2.275)
  silkscreen extent -1.6,-2.6 1.6,2.6
D_SMA [mm] "SMA Molded Diode, 2-Leads, Body 4.3x2.7mm, SOD-128"
  rect 2.2x1.6 smd mask-2539.97: 1(-2.2,0)
  rrect50% 2.2x1.6 smd mask-2539.97: 2(2.2,0)
  silkscreen extent -2.4,-1.5 2.9,1.5, body extent -2.75,-1.4 2.75,1.4, height 2.6
D_SMB [mm] "SMB Molded Diode, 2-Leads, Body 4.3x3.5mm"
  rect 2.2x2.2 smd mask+0.102: 1(-2.1,0)
  rrect50% 2.2x2.2 smd mask+0.102: 2(2.1,0)
  Top Layer pour cut-out: -1.524,2.1 -1.524,-2.1 1.524,-2.1 1.524,2.1
  silkscreen extent -2.4,-2.1 3.2,2.1, body extent -2.75,-1.95 2.75,1.95, height 2.45
DPAK229P990X238-3N [mm]
  rect 0.97x2.83 smd mask-2539.97: 1(-2.29,-4.14) 3(2.29,-4.14)
  rect 5.63x6.09 smd: 4(0,2.51)
  silkscreen extent -4.3,-4.5 3.37,4.09, body extent -3.25,-4.95 3.25,4.95, height 2.39
FH_24101812#1 [mm] "FUSE HOLDER for 2410 and 1812 sizes"
  rrect30% 4.5x4 smd: 1(-3,0) 2(2.9,0)
  silkscreen extent -4.9,-2.6 4.9,2.6, body extent -5.1,-2.51 5.1,2.52, height 4.11
FH_24101812#2 [mm] "FUSE HOLDER for 2410 and 1812 sizes"
  rrect30% 4.5x4 smd paste-2: 1(-3,0) 2(2.9,0)
  silkscreen extent -4.9,-2.6 4.9,2.6, body extent -5.1,-2.51 5.1,2.52, height 4.11
FP-ACM2520-2P-MFG [mm]
  rect 0.8x0.4 smd mask-2539.97: 1(-1.15,0.65) 2(-1.15,-0.65) 3(1.15,-0.65) 4(1.15,0.65)
  silkscreen extent -2.22,-1.1 0.38,1.1, body extent -1.65,-1.2 1.65,1.2, height 0.25
FP-DDA0008J-IPC_C [mm]
  rect 1.874x0.542 smd mask+0: 1(-2.316,1.905)
  rrect100% 1.874x0.542 smd mask+0: 2(-2.316,0.635) 3(-2.316,-0.635) 4(-2.316,-1.905) 5(2.316,-1.905) 6(2.316,-0.635) 7(2.316,0.635) 8(2.316,1.905)
  rect 2.3x3.1 smd mask+0: 9(0,0)
  silkscreen extent -3.97,-2.45 0.75,2.45, body extent -3,-2.45 3,2.45, height 1.7
IND_AMPLA7050S-100MT [mm]
  rect 2.95x3.5 smd mask+0.102: 1(-2.725,0) 2(2.725,0)
  silkscreen extent -3.65,-3.3 3.65,3.3, body extent -3.72,-3.3 3.72,3.3, height 4.8
JPH_3 [mm] "Jumper Header 2.54mm Pitch, 3PIN, Vertical"
  rect 2x2 hole 1.1 mask-2539.97: 1(-2.54,0) 2(0,0) 3(2.54,0)
  silkscreen extent -3.9,-1.4 3.9,1.4, body extent -3.82,-1.27 3.8,1.27, height 8.57
LED1206GRN [mm] "LED, 1206, GREEN"
  rect 1x1.6 smd mask-2539.97: 1(-1.4,0)
  rrect50% 1x1.6 smd mask-2539.97: 2(1.4,0)
  Top Layer pour cut-out: -1.1,1.1 -1.1,-1.1 1.1,-1.1 1.1,1.1
  silkscreen extent -2.1,-1 2.3,1, body extent -1.6,-0.8 1.6,0.8, height 0.68
PCBComponent_1 [mm]
  silkscreen extent -5.35,-4.64 5.33,4.64
PRKT-SOT23-3_V [mm] "SOT23, 3-Leads, Body 2.92x1.3mm, Pitch 0.94mm"
  rect 0.84x0.84 smd mask-2539.97: 1(-1,0.94) 3(1,0)
  rect 0.84x0.9 smd mask-2539.97: 2(-1,-0.94)
  silkscreen extent -2.09,-1.46 0.65,1.46, body extent -0.65,-1.46 0.65,1.46, height 1.17
R0805 [mm] "CHIP RESISTOR 1/8 WATT ,2.0X1.3mm, 0805, 2012"
  rrect50% 1x1.2 smd mask-2539.97: 1(-1,0) 2(1,0)
  Top Layer pour cut-out: -0.5,0.8 0.5,0.8 0.5,-0.8 -0.5,-0.8
  silkscreen extent -1.7,-0.8 1.7,0.8, body extent -1.15,-0.67 1.15,0.68, height 0.76
R1206#1 [mm] "CHIP RESISTOR 1/4 WATT, Body 3.2x1.6mm,1206, 3216"
  rrect50% 1.6x1.6 smd mask-2539.97: 1(-1.4,0) 2(1.4,0)
  Top Layer pour cut-out: -0.8,1 -0.8,-1 0.8,-1 0.8,1
  silkscreen extent -2.4,-1 2.4,1, body extent -1.67,-0.86 1.68,0.87, height 0.85
R1206#2 [mm] "CHIP RESISTOR 1/4 WATT, Body 3.2x1.6mm,1206, 3216"
  rrect50% 1.6x1.6 smd mask+0.075: 1(-1.4,0) 2(1.4,0)
  Top Layer pour cut-out: -0.8,1 -0.8,-1 0.8,-1 0.8,1
  silkscreen extent -2.4,-1 2.4,1, body extent -1.68,-0.86 1.68,0.86, height 0.85
SOIC127P600X175-8N [mm]
  rrect25% 1.97x0.6 smd mask-2539.97: 1(-2.475,1.905) 2(-2.475,0.635) 3(-2.475,-0.635) 4(-2.475,-1.905) 5(2.475,-1.905) 6(2.475,-0.635) 7(2.475,0.635) 8(2.475,1.905)
  silkscreen extent -4.54,-2.52 2,2.6
SOIC254P1030X460-4N [mm]
  rrect25% 1.41x1.47 smd mask+0.102: 1(-4.85,1.27) 2(-4.85,-1.27) 3(4.85,-1.27) 4(4.85,1.27)
  silkscreen extent -6.35,-2.44 3.4,2.44, body extent -3.94,-2.29 3.94,2.29, height 7.8
SOT23_3 [mm] "SOT-23, Micro3, MO-178, TO-236AB, MO-193C, SuperSOT3, SC-59, 1.5x3mm, Pitch 1.9mm"
  rrect50% 1.2x0.7 smd mask+0.1: 1(-1.3,1) 2(-1.3,-1) 3(1.3,0)
  silkscreen extent -0.8,-1.6 0.8,1.6, body extent -1.32,-1.5 1.32,1.5, height 1.08
STM-LQFP100_N [mm] "Thin QFP, 100-Leads, Body 14x14mm, Pitch 0.5mm, IPC Medium Density"
  oval 1.8x0.3 smd mask+0.102: 1(-7.55,6) 2(-7.55,5.5) 3(-7.55,5) 4(-7.55,4.5) 5(-7.55,4) 6(-7.55,3.5) 7(-7.55,3) 8(-7.55,2.5) 9(-7.55,2) 10(-7.55,1.5) 11(-7.55,1) 12(-7.55,0.5) 13(-7.55,0) 14(-7.55,-0.5) 15(-7.55,-1) 16(-7.55,-1.5) 17(-7.55,-2) 18(-7.55,-2.5) 19(-7.55,-3) 20(-7.55,-3.5) 21(-7.55,-4) 22(-7.55,-4.5) 23(-7.55,-5) 24(-7.55,-5.5) 25(-7.55,-6) 51(7.55,-6) 52(7.55,-5.5) 53(7.55,-5) 54(7.55,-4.5) 55(7.55,-4) 56(7.55,-3.5) 57(7.55,-3) 58(7.55,-2.5) 59(7.55,-2) 60(7.55,-1.5) 61(7.55,-1) 62(7.55,-0.5) 63(7.55,0) 64(7.55,0.5) 65(7.55,1) 66(7.55,1.5) 67(7.55,2) 68(7.55,2.5) 69(7.55,3) 70(7.55,3.5) 71(7.55,4) 72(7.55,4.5) 73(7.55,5) 74(7.55,5.5) 75(7.55,6)
  oval 0.3x1.8 smd mask+0.102: 26(-6,-7.55) 27(-5.5,-7.55) 28(-5,-7.55) 29(-4.5,-7.55) 30(-4,-7.55) 31(-3.5,-7.55) 32(-3,-7.55) 33(-2.5,-7.55) 34(-2,-7.55) 35(-1.5,-7.55) 36(-1,-7.55) 37(-0.5,-7.55) 38(0,-7.55) 39(0.5,-7.55) 40(1,-7.55) 41(1.5,-7.55) 42(2,-7.55) 43(2.5,-7.55) 44(3,-7.55) 45(3.5,-7.55) 46(4,-7.55) 47(4.5,-7.55) 48(5,-7.55) 49(5.5,-7.55) 50(6,-7.55) 76(6,7.55) 77(5.5,7.55) 78(5,7.55) 79(4.5,7.55) 80(4,7.55) 81(3.5,7.55) 82(3,7.55) 83(2.5,7.55) 84(2,7.55) 85(1.5,7.55) 86(1,7.55) 87(0.5,7.55) 88(0,7.55) 89(-0.5,7.55) 90(-1,7.55) 91(-1.5,7.55) 92(-2,7.55) 93(-2.5,7.55) 94(-3,7.55) 95(-3.5,7.55) 96(-4,7.55) 97(-4.5,7.55) 98(-5,7.55) 99(-5.5,7.55) 100(-6,7.55)
  silkscreen extent -7.67,-6.25 6.25,6.82, body extent -7,-7 7,7, height 1.6
TO254P1528X508-4_3N-V1 [mm] "TO,2.54mm pitch;3 pin,15.28mm L X 9.00mm W X 5.08mm H body"
  rect 4.6x1.35 smd mask-2539.97: 1(-5.155,2.54) 3(-5.155,-2.54)
  rect 8.8x10.8 smd paste-4.4: 2(5.155,0)
  silkscreen extent -7.31,-5.1 0.4,5.1, body extent -6.59,-5.08 8.69,5.08, height 5.09
USBC_SMD_16_DX07S016JA1 [mm] "CONN, USB, Type C, DX07S016JA1, popular*"
  rrect50% 0.5x1 smd mask-2539.97: A1B12(3.1,0) A4B9(2.35,0) B1A12(-3.1,0) B4A9(-2.35,0)
  rrect50% 0.3x1 smd mask-2539.97: A5(1.25,0) A6(0.25,0) A7(-0.25,0) A8(-1.25,0) B5(-1.75,0) B6(-0.75,0) B7(0.75,0) B8(1.75,0)
  oval 1x2.4 hole 0.6 slot 1.8 at 90 deg: SH1(-4.3,4.3) SH2(4.3,4.3)
  oval 1x2 hole 0.6 slot 1.6 at 90 deg: SH3(-4.3,0.4) SH4(4.3,0.4)
  round 0.7 hole 0.7 unplated: ""(-2.99,1.12) ""(2.99,1.12)
  silkscreen extent -4.5,1.6 4.5,6.72, body extent -4.47,-0.2 4.47,6.7, height 3.18
VREG_TLV76133DCYR [mm]
  rect 2.15x0.95 smd mask-2539.97: 1(-2.9,2.3) 2(-2.9,0) 3(-2.9,-2.3)
  rect 2.15x3.25 smd mask-2539.97: 4(2.9,0)
  silkscreen extent -4.7,-3.25 1.75,3.25, body extent -3.5,-3.25 3.5,3.25, height 1.8
XH_4 [mm] "PW10-x-M, JST-BxB-XH-A pitch: 2.5mm, 3A/250v"
  rect 2x2 hole 1.1 mask-2539.97: 1(-3.75,0) 2(-1.25,0) 3(1.25,0) 4(3.75,0)
  silkscreen extent -6.4,-2.4 6.4,3.5, body extent -6.25,-2.3 6.25,3.4, height 7
XTL_2_11X5 [mm] "SMD crystal resonator, ABL, ABLS, HC-49, HC49 11X4.5MM"
  oval 3x1.5 smd mask+0.102: 1(-5.6,0) 2(5.6,0)
  silkscreen extent -5.7,-2.4 5.7,2.4, body extent -6.4,-2.41 6.4,2.41, height 4.3

## Part data
B1 B2: "LGA-16(4.7x5.2) Isolated CAN Transceivers (with Power) ROHS", Manufacturer_Name=ChipAnalog, Datasheet Link=https://e.chipanalog.com/Public/Uploads/uploadfile/files/20250325/CAIS2062AdatasheetVersion1.01en20250325.pdf, Geometry.Height=1.09mm, Manufacturer_Part_Number=CA-IS2062A
C1 C2 C3 C4 C5 C6 C7 C8 C9 C10 C11 C12 C13 C15 C16 C17 C22 C23 C24 C29 C30 C31 C32 C33 C34 C35 C36 C37 C39 C41 C42 C43 C44 C45 C46 C47 C48 C49 C50 C51 C52 C53 C54 C55 C56 C57 C58 C59 C60 C61 C62 C63 C64 C65 C66 C67 C68 C69 C70 C71 C72 C73 C74 C75 C76 C77: library part CAP_SMD_MLCC_1206, "CAP, MLCC", ASSEMBLY=ASSEMBLY, MANF=-, MANF_P#=MANF_PART#, PARAM="-, -%", PARAM2=-V, PRICE="100= 1$"
C14 C18 C19 C20 C21 C25 C26 C27: library part CAP_SMD_MLCC_0805, "CAP, MLCC", ASSEMBLY=ASSEMBLY, MANF=-, MANF_P#=MANF_PART#, PARAM="-, -%", PARAM2=-V, PRICE="100= 1$"
C28: library part CAP_THD_EL_470uF_35v, "CAP, THD, ELEC,", ASSEMBLY=ASSEMBLY, DESC=DESCRIPTION, DIST#=MOUSER, MANF=MANF, MANF_P#=MANF_PART#, PARAM=20%, PARAM2=35v, PRICE="10= -$"
C38: library part CAP_THD_EL_100uF_50v, "CAP, THD, ELEC,", ASSEMBLY=ASSEMBLY, DESC=DESCRIPTION, DIST#=MOUSER, MANF=MANF, MANF_P#=MANF_PART#, PARAM=20%, PARAM2=50v, PRICE="10= -$"
C40: library part CAP_SMD_TAN, "CAP, SMD, TAN", MANF=VISHAY, MANF_P#=T55A106M6R3C0300, PARAM="20%, 300mOhm, -55~105oC", PARAM2=6.3V, PRICE=0.46$
D1 D4: library part DIODE_SMD_SCHOTTKY_SS34, "DIODE, SCHOTTKY, 20V, 3A", ASSEMBLY=ASSEMBLY, DESC=DESCRIPTION, MANF=VISHAY, PARAM=20V, PARAM2=3A, PRICE=PRICE
  D4: MANF_P#=SS34
D2 D3 D6 D10 D13 D16 D19 D22 D25 D28 D31 D34 D37 D40 D43: library part LED_SMD_1206_GRN, "LED, SMD, 1206, GREEN", ASSEMBLY=ASSEMBLY, DESC=DESCRIPTION, MANF=-, MANF_P#=-, MountType=SMT, PARAM=20mA, PARAM2=2.2V, PartType=LED, PRICE=36t@Javan
D5: library part DIODE_SMD_SCHOTTKY_SS34, "DIODE,TVS, 24V, 15A", ASSEMBLY=ASSEMBLY, DESC=DESCRIPTION, MANF=VISHAY, MANF_P#=SS34, PARAM=20V, PARAM2=3A, PRICE=PRICE
D7: library part DIODE_SMD_SCHOTTKY_B345A, "DIODE, SCHOTTKY, 40V, 3A", ASSEMBLY=ASSEMBLY, DESC=DESCRIPTION, MANF=DIODES, MANF_P#=B345AE-13, PARAM="3A, -50~150oC", PARAM2="45Vrrm, 0.45Vf", PRICE=0.35$
D8 D9 D11 D12 D14 D15 D17 D18 D20 D21 D23 D24 D26 D27 D29 D30 D32 D33 D35 D36 D38 D39 D41 D42: library part MBRD835L, "Diode Schottky 35 V 8A Surface Mount DPAK", PACKAGE="TO-252-3 MICROSS/On Semiconductor", Check_prices=https://www.snapeda.com/parts/MBRD835L/Onsemi/view-part/?ref=eda, MF="ON Semiconductor", MP=MBRD835L, SnapEDA_Link=https://www.snapeda.com/parts/MBRD835L/Onsemi/view-part/?ref=snap
FH1 FH2 FH3 FH4 FH5 FH6 FH7 FH8 FH9 FH10 FH11 FH12 FH13: library part FUSE_SMD_HOLDER_24101812, "Fuse SMD2410 Holder", PACKAGE=SMD,5.0x9.7mm, MANF=Littelfuse, MANF_P#=01550900M, PARAM="max. 10A", PARAM2=125v, PRICE=0.2$
FUSE_SMD1: library part RES_SMD_1206, "resetable fuse", ASSEMBLY=ASSEMBLY, DESC=DESCRIPTION, DIST#=MOUSER, MANF=-, MANF_P#=-, PARAM="1%, 0.25W", PARAM2=-, PRICE=-
J1 J2 J3: "PW10-x-M, JST-BxB-XH-A pitch: 2.5mm, 3A/250v", MANF=JST, MANF_P#=B4B-XH-A, PARAM=3.0A, PARAM2=250v
J4: library part CONN_USBC_SMD_16_DX07S016JA1, "CONN, USB, Type C, USB 2.0, Right-Angle, SMD", MANF=JAE, MANF_P#=DX07S016JA1R1500, PARAM=5A, PRICE=1.5$
J5 J6: "CONN, ATX POWER, 6 P", PACKAGE=ATXPWR-6pin, MANF=TE, MANF_P#=4-1775099-1, MountType=THD, Part Type=Conn.
JP1 JP2: library part JUMPER_HDR_3P, "JUMPER, HEADER 3PIN", MANF=MANF, MANF_P#=MANF_P#
L1 L2: library part CMP-08256-000009-1, "CMC 200MA 2LN 1KOHM SMD", Case/Package=1008, Current=200mA, DC Resistance (DCR)=900mR, Max Operating Temperature=85°C, Min Operating Temperature=-40°C, Package Quantity=1, Test Frequency=100MHz, Voltage Rating=20V, DC Current=200mA, Depth=2.2mm, Height=0.051inch, Impedance=1kR, Lead Free="Lead Free", Length=0.098inch, Max DC Current=200mA, Mount="Surface Mount", Number of Lines=2, Packaging="Tape and Reel", Series=ACM, Termination=SMD/SMT, Width=0.079inch
L3: library part AMPLA7050S-100MT, "Inductor Power Shielded/Molded Wirewound 10uH 20% 100KHz Carbonyl Powder 4A 0.069Ohm DCR T/R", PACKAGE=Package, Availability="In Stock", Check_prices=https://www.snapeda.com/parts/AMPLA7050S-100MT/Abracon/view-part/?ref=eda, MF="Abracon Corporation", MP=AMPLA7050S-100MT, PRICE=None, Purchase-URL=https://pricing.snapeda.com/search/part/AMPLA7050S-100MT/?ref=eda, SnapEDA_Link=https://www.snapeda.com/parts/AMPLA7050S-100MT/Abracon/view-part/?ref=snap
LO1 LO2 LO3 LO4 LO5 LO6 LO7 LO8 LO9 LO10 LO11 LO12: "CONN, ATX POWER, 4 P", PACKAGE=ATXPWR-4pin, MANF="TE, Molex", MANF_P#="4-1775099-0, 39281043", MountType=THD, Part Type=Conn.
N1 N2 N3 N4 N5 N6 N7 N8 N9 N10 N11 N12 P1 P2 P3 P4 P5 P6 P7 P8 P9 P10 P11 P12 POWER1: "CONN, ATX POWER, 2 P", PACKAGE=ATXPWR-2pin, MANF=Molex, MANF_P#=39281023, MountType=THD, Part Type=Conn.
OP1 OP2 OP3 OP4 OP5 OP6 OP7 OP8 OP9 OP10 OP11 OP12: "Optoisolator Transistor Output 5000Vrms 1 Channel 4-SMD", PACKAGE="SMD-4 Everlight Electronics Co Ltd", Check_prices=https://www.snapeda.com/parts/EL817S/Everlight+Electronics+Co+Ltd/view-part/?ref=eda, MF="Everlight Electronics", MP=EL817S, SnapEDA_Link=https://www.snapeda.com/parts/EL817S/Everlight+Electronics+Co+Ltd/view-part/?ref=snap
Q1 Q3 Q5 Q7 Q9 Q11 Q13 Q15 Q17 Q19 Q21 Q23: "OptiMOS - P2 Power-Transistor, P-channel-Enhancement mode, VDS -30V", Manufacturer="Infineon Technologies", Manufacturer Order NumberManufacturer Order Number=IRF9530NS, PackageReference=PG-TO263-3-901
Q2 Q4 Q6 Q8 Q10 Q12 Q14 Q16 Q18 Q20 Q22 Q24: library part MOSN_2N7002_SOT23, "MOSFET, N-CH, 60V, 0.3A", ASSEMBLY=ASSEMBLY, MANF=NXP, MANF_P#=2N7002, PARAM=0.3A, PARAM2=60v, PRICE=0.3t@Javan
R1 R2 R3 R4 R5 R6 R7 R12 R13 R14 R15 R16 R17 R18 R19 R20 R21 R22 R23 R24 R25 R26 R27 R28 R29 R30 R31 R32 R33 R34 R35 R36 R37 R38 R39 R40 R41 R42 R43 R44 R45 R46 R47 R48 R49 R50 R51 R52 R53 R54 R55 R56 R57 R58 R59 R60 R61 R62 R63 R64 R65 R66 R67 R68 R69 R70 R71 R72 R73 R74 R75 R76 R77 R78 R79 R80 R81 R82 R83 R84 R85 R86 R87 R88 R89 R90 R91 R92 R93 R94 R95 R96 R97 R98 R99 R100 R101 R102 R103 R104 R105 R106 R107 R108 R109 R110 R111 R112 R113 R114 R115 R116 R117 R118 R119 R120 R121 R122 R123 R124 R125 R126: library part RES_SMD_1206, "RESISTOR, SMD", ASSEMBLY=ASSEMBLY, DESC=DESCRIPTION, DIST#=MOUSER, MANF=-, MANF_P#=-, PARAM="1%, 0.25W", PARAM2=-, PRICE=-
R8 R9 R10 R11: library part RES_SMD_0805, "RESISTOR, SMD", ASSEMBLY=ASSEMBLY, DESC=DESCRIPTION, DIST#=MOUSER, MANF=-, MANF_P#=-, PARAM=-W, PARAM2=1%, PRICE="100= 0.5$"
RAMON1 RAMON2: library part RamonLogo
U1: "ARM Cortex-M4 32-bit MCU+FPU, 210 DMIPS, 1024 kB Flash, 192 kB Internal RAM, 82 I/Os, 100-pin LQFP, -40 to 85 degC, Tray", I/Os (High Current)=82, Manufacturer=STMicroelectronics, Operating Frequency(F) (Processor speed) (MHz)=168, Supplier Part Number 1=497-11605-ND, Supply Voltage(Vcc) max (V)=3.6, Supply Voltage(Vcc) min (V)=1.8, ComponentLink1Description="Manufacturer URL", ComponentLink1URL=http://www.st.com/web/en/home.html, ComponentLink2Description=Datasheet, ComponentLink2URL=http://www.st.com/st-web-ui/static/active/en/resource/technical/document/datasheet/DM00037051.pdf, ComponentLink3Description="Package Specification", ComponentLink3URL=http://www.st.com/st-web-ui/static/active/en/resource/technical/document/data_brief/DM00071938.pdf, Core="ARM Cortex-M4", D/A Converter=2x12-bit, DatasheetVersion="Rev. 4", FLASH Size (Prog) (kB)=1024, Internal RAM Size (kB)=192, Mounting Technology="Surface Mount", PackageDescription="100-Pin Low Profile Quad Flat Package, 14 x 14 mm Body, 0.5 mm Pitch", PackageReference=LQFP100, PackageVersion="Rev. 1, 06/2013", Packing=Tray, PartNumber=STM32F407VGT6, Supplier 1=Digi-Key, Supplier 2=Farnell, Supplier 3=Newark, Supplier 4=Mouser, Supplier Part Number 2=2064368, Supplier Part Number 3=73T2333, Supplier Part Number 4=511-STM32F407VGT6
U2 U3: library part CMP-2000-07553-1, "TVS Array - Asymmetrical Data Line Protector, 600 W, 7.5 V, -55 to 150 degC, 3-Pin SOT23, RoHS, Tape and Reel", Capacitance=75pF, Case\/Package=SOT-23, Clamping Voltage=17V, Current=20uA, Manufacturer="Protek Devices", Max Operating Temperature=150degC, Min Breakdown Voltage=7.5V, Min Operating Temperature=-55degC, Package Description="3-Pin Small Outline Transistor, Body 2.92 x 1.3 mm, Pitch 0.94 mm", Package Reference=SOT23-3, Power Dissipation=600W, Voltage=12V, Working Voltage=7V, Datasheet URL=www.protekdevices.com/xyz/documents/datasheets/psm712.pdf, Datasheet Version=10/2013, Depth=1.4mm, Direction=Bidirectional, Element Configuration=Dual, Lead Free=LeadFree, Leakage Current=20uA, Length=3.04mm, Manufacturer URL=http://www.protekdevices.com/, Mounting Technology=SurfaceMount, Number of Pins=3, Packaging=TapeandReel, Radiation Hardening=No, RoHSCompliant=True
U4: library part CMP-04918-000184-1, "IC REG BUCK ADJUSTABLE 3A 8SOPWR", Max Input Voltage=36V, Max Operating Temperature=125°C, Max Output Voltage=24V, Min Input Voltage=3.8V, Min Operating Temperature=-40°C, Min Output Voltage=1V, Output Current=3A, Switching Frequency=400kHz, Mount="Surface Mount", Number of Outputs=1, Number of Pins=8, Output Configuration=Positive, Output Type=Adjustable, Packaging="Cut Tape", RoHS Compliant=Yes, Synchronous Rectifier=Yes
U5: "1-A 16-V high-PSRR linear voltage regulator", PACKAGE="SOT-223-4 Texas Instruments", Check_prices=https://www.snapeda.com/parts/TLV76133DCYR/Texas+Instruments/view-part/?ref=eda, MF="Texas Instruments", MP=TLV76133DCYR, SnapEDA_Link=https://www.snapeda.com/parts/TLV76133DCYR/Texas+Instruments/view-part/?ref=snap
U6 U7 U8 U9 U10 U11 U12 U13 U14 U15 U16 U17: library part ACS712ELCTR-05B-T, PACKAGE=None, Availability=Unavailable, MF="{'manufacturer': u'Allegro MicroSystems'}", MP=ACS712ELCTR-05B-T, PRICE=None
X1: library part XTL_2_HC49_8MHz_SMD, "Crystal MOST POPULAR ABL HC49 PACKAGE", MANF=ABRACON, MANF_P#=ABLS-8.000MHZ-B4-T, PARAM="8MHz, 18pF, 30PPM, -20~70oC", PRICE=0.3$

## Free pads (board coordinates)
  round 3 hole 3.2: 1(130.5,16.5) 2(130.5,-16.5) 3(-130.5,16.5) 4(-130.5,-16.5)

## Via types
v1: diameter 1, hole 0.6, Top Layer to Bottom Layer, tented both sides, 648 vias
v2: diameter 1.2, hole 0.6, Top Layer to Bottom Layer, tented both sides, 4 vias
v3: diameter 1.2, hole 0.7, Top Layer to Bottom Layer, tented both sides, 1 vias

## Nets (pads, with @x,y where several pads share a name; then routed paths per layer and width w, separated by ;. In a path a pad name is that pad's centre, name@x,y a point inside that pad or via, vN(x,y) a via of type N, cw(c..) or ccw(c..) an arc to the next point about the centre after c; other vN are vias at no path point)
1GND: D8.1 D8.3 D9.1 D9.3 LO1.2 LO1.4 N1.1 N1.2 R23.2 R24.2 R27.2 | length 60.3
  Top Layer w0.254: R27.2@-70.7,-2.4 -70.7,-5.3 v1@-64.2,-5.3
  Bottom Layer w0.4: v1(-64.2,-4.8) -57.9,-4.8 -55.2,-2.1 -55.2,32.6 -57.9,35.3 R23.2@-60.2,35.3